# Altium PCB PS-25-001-E-02.PcbDoc
Units mil, origin at the board's own origin, x right, y up, seen from the top; angles counter-clockwise.
Board outline 2755.91 x 2362.2 mil, 5 copper layers (Top Layer, Internal Plane 3, Internal Plane 4, Internal Plane 2, Bottom Layer), stack 37.034 mil thick; 144 components, 56 nets, 347 pads, 244 vias.
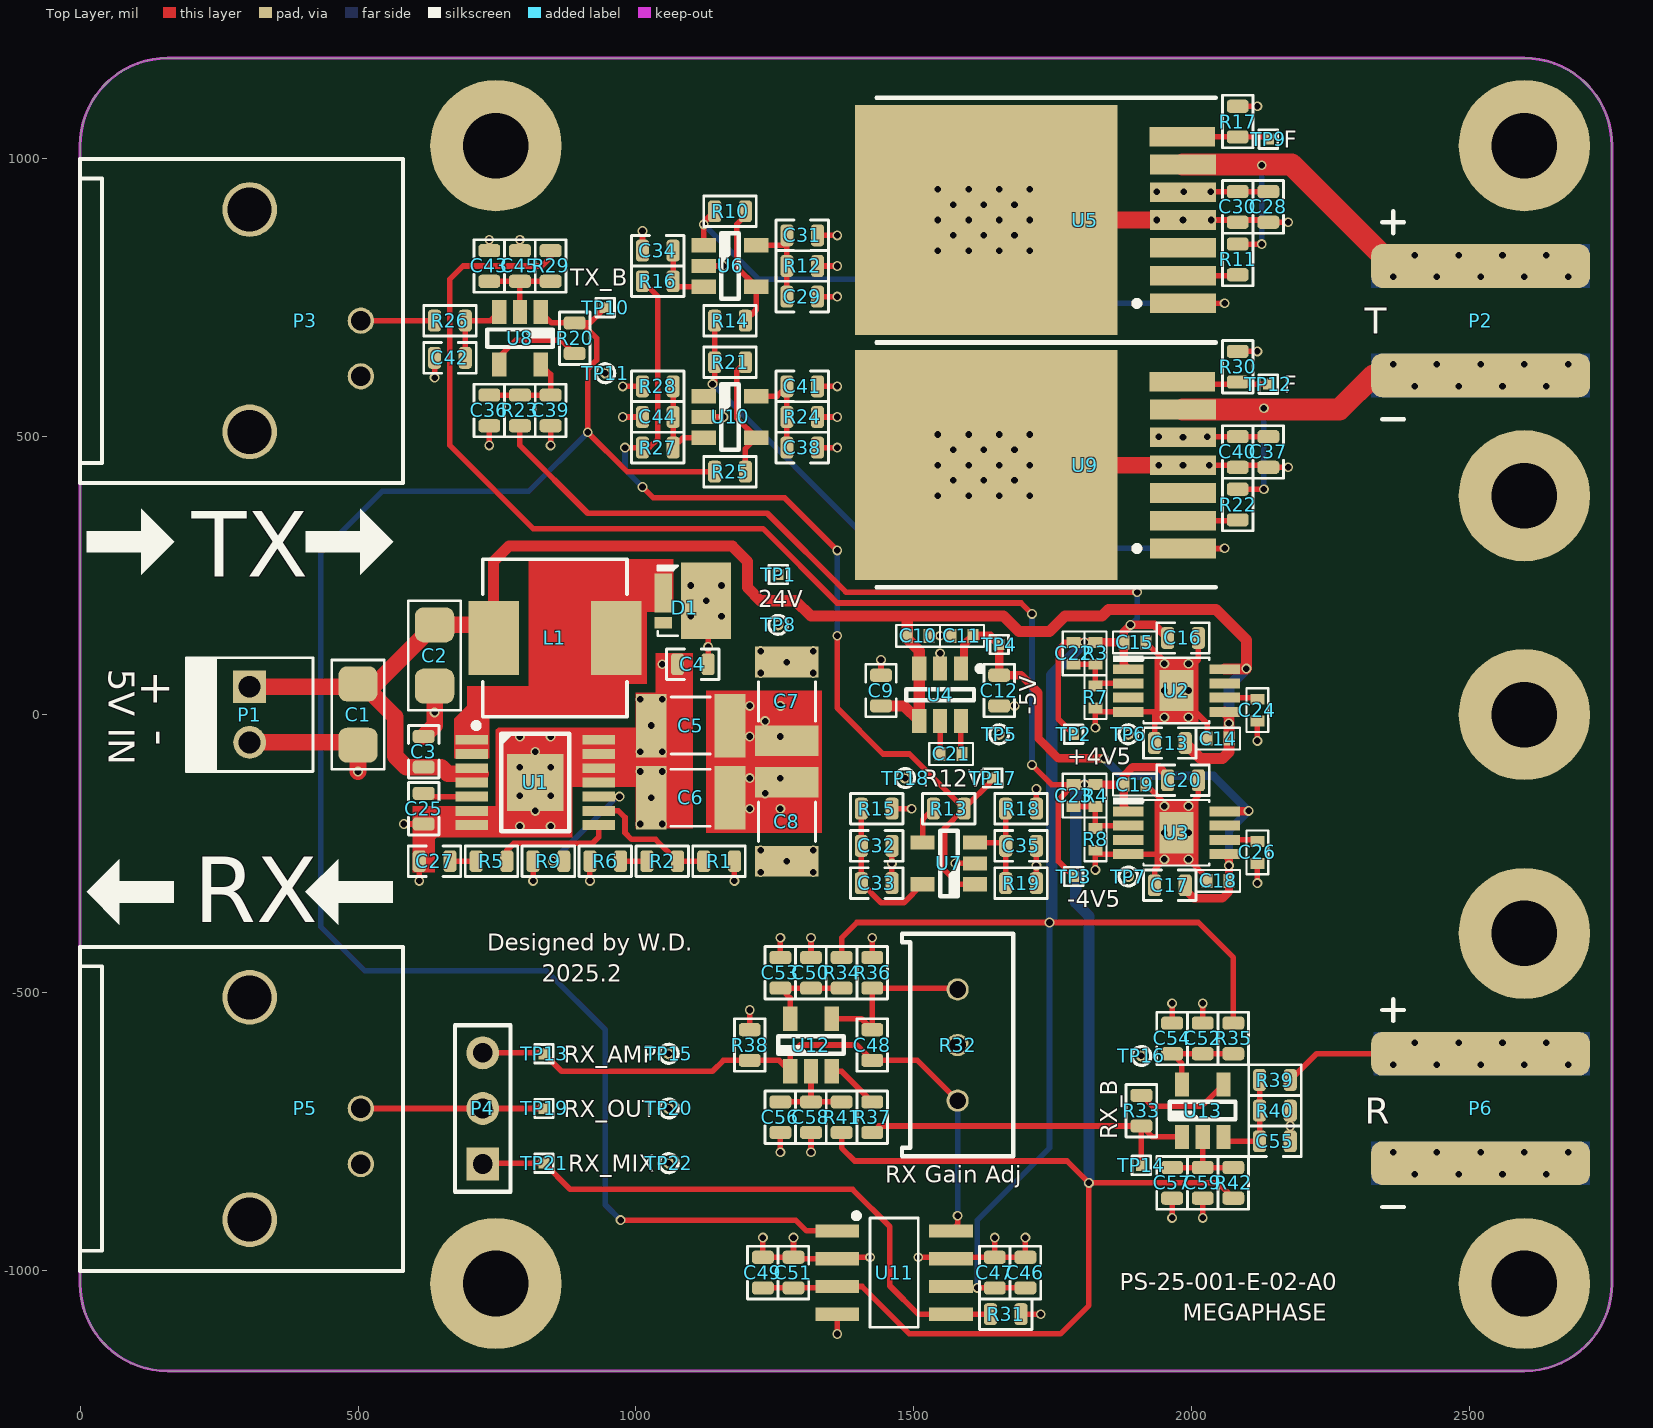
[diagram p0: Top Layer view]
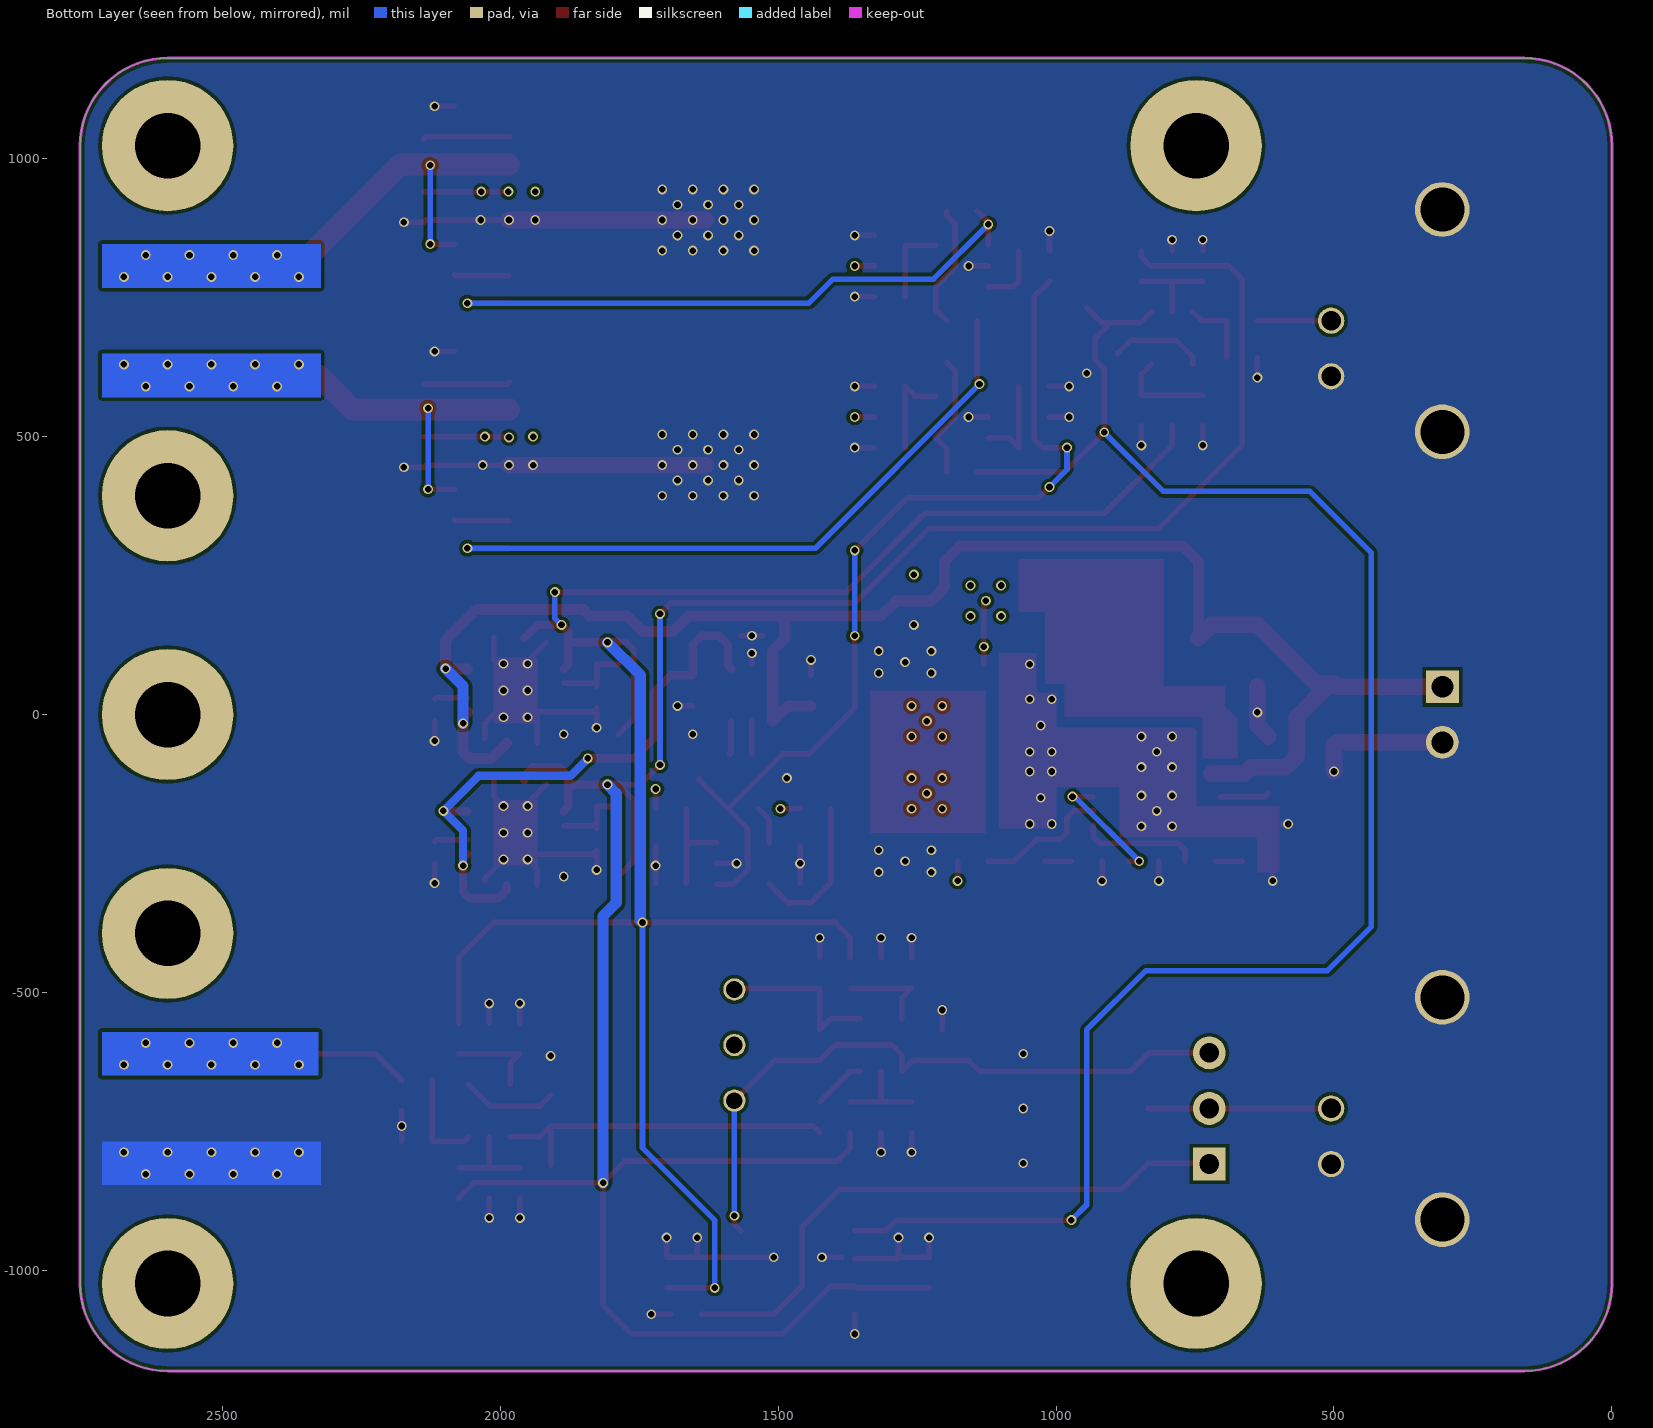
[diagram p1: Bottom Layer view, seen from below]
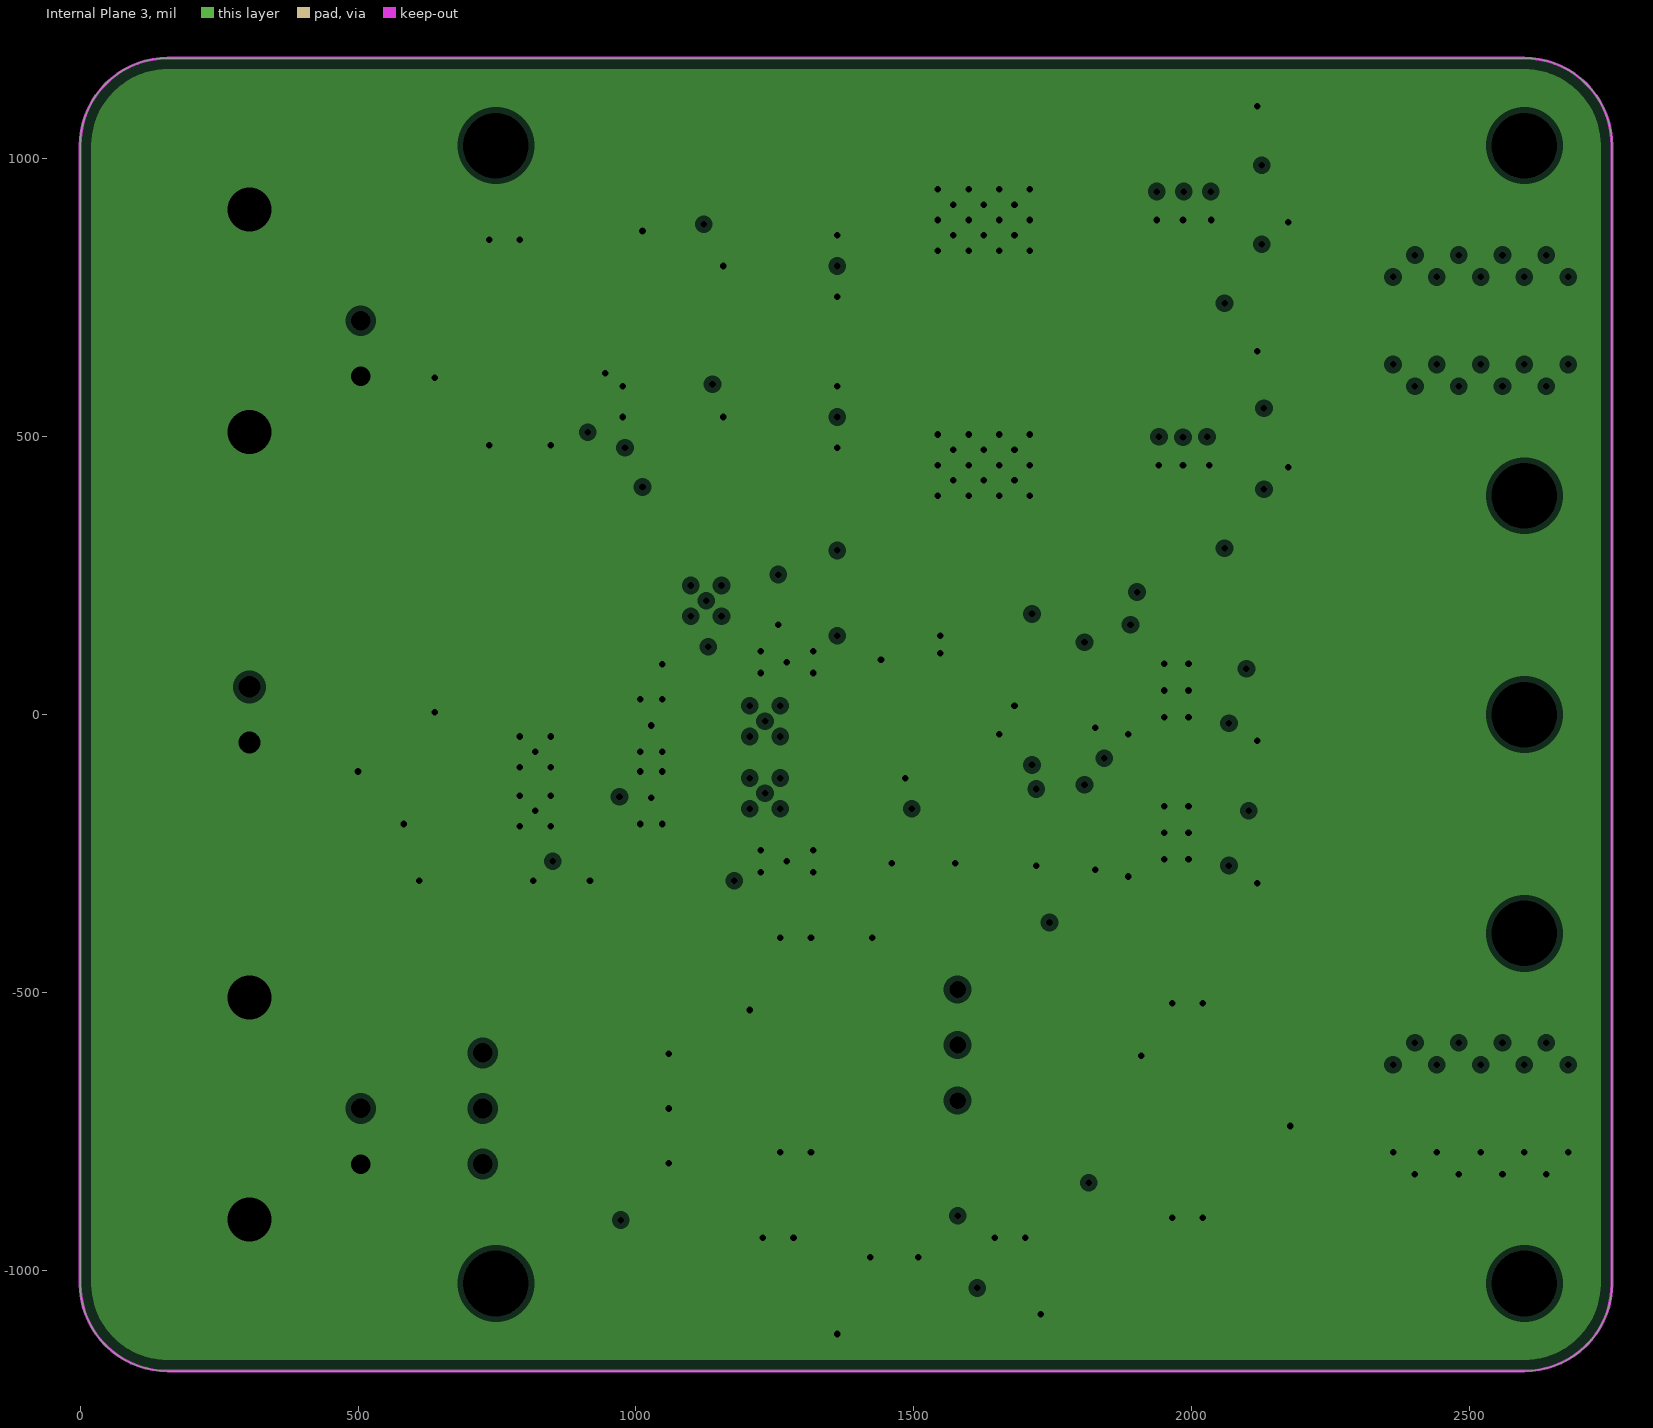
[diagram p2: Internal Plane 3, clearances drawn from the general rule]
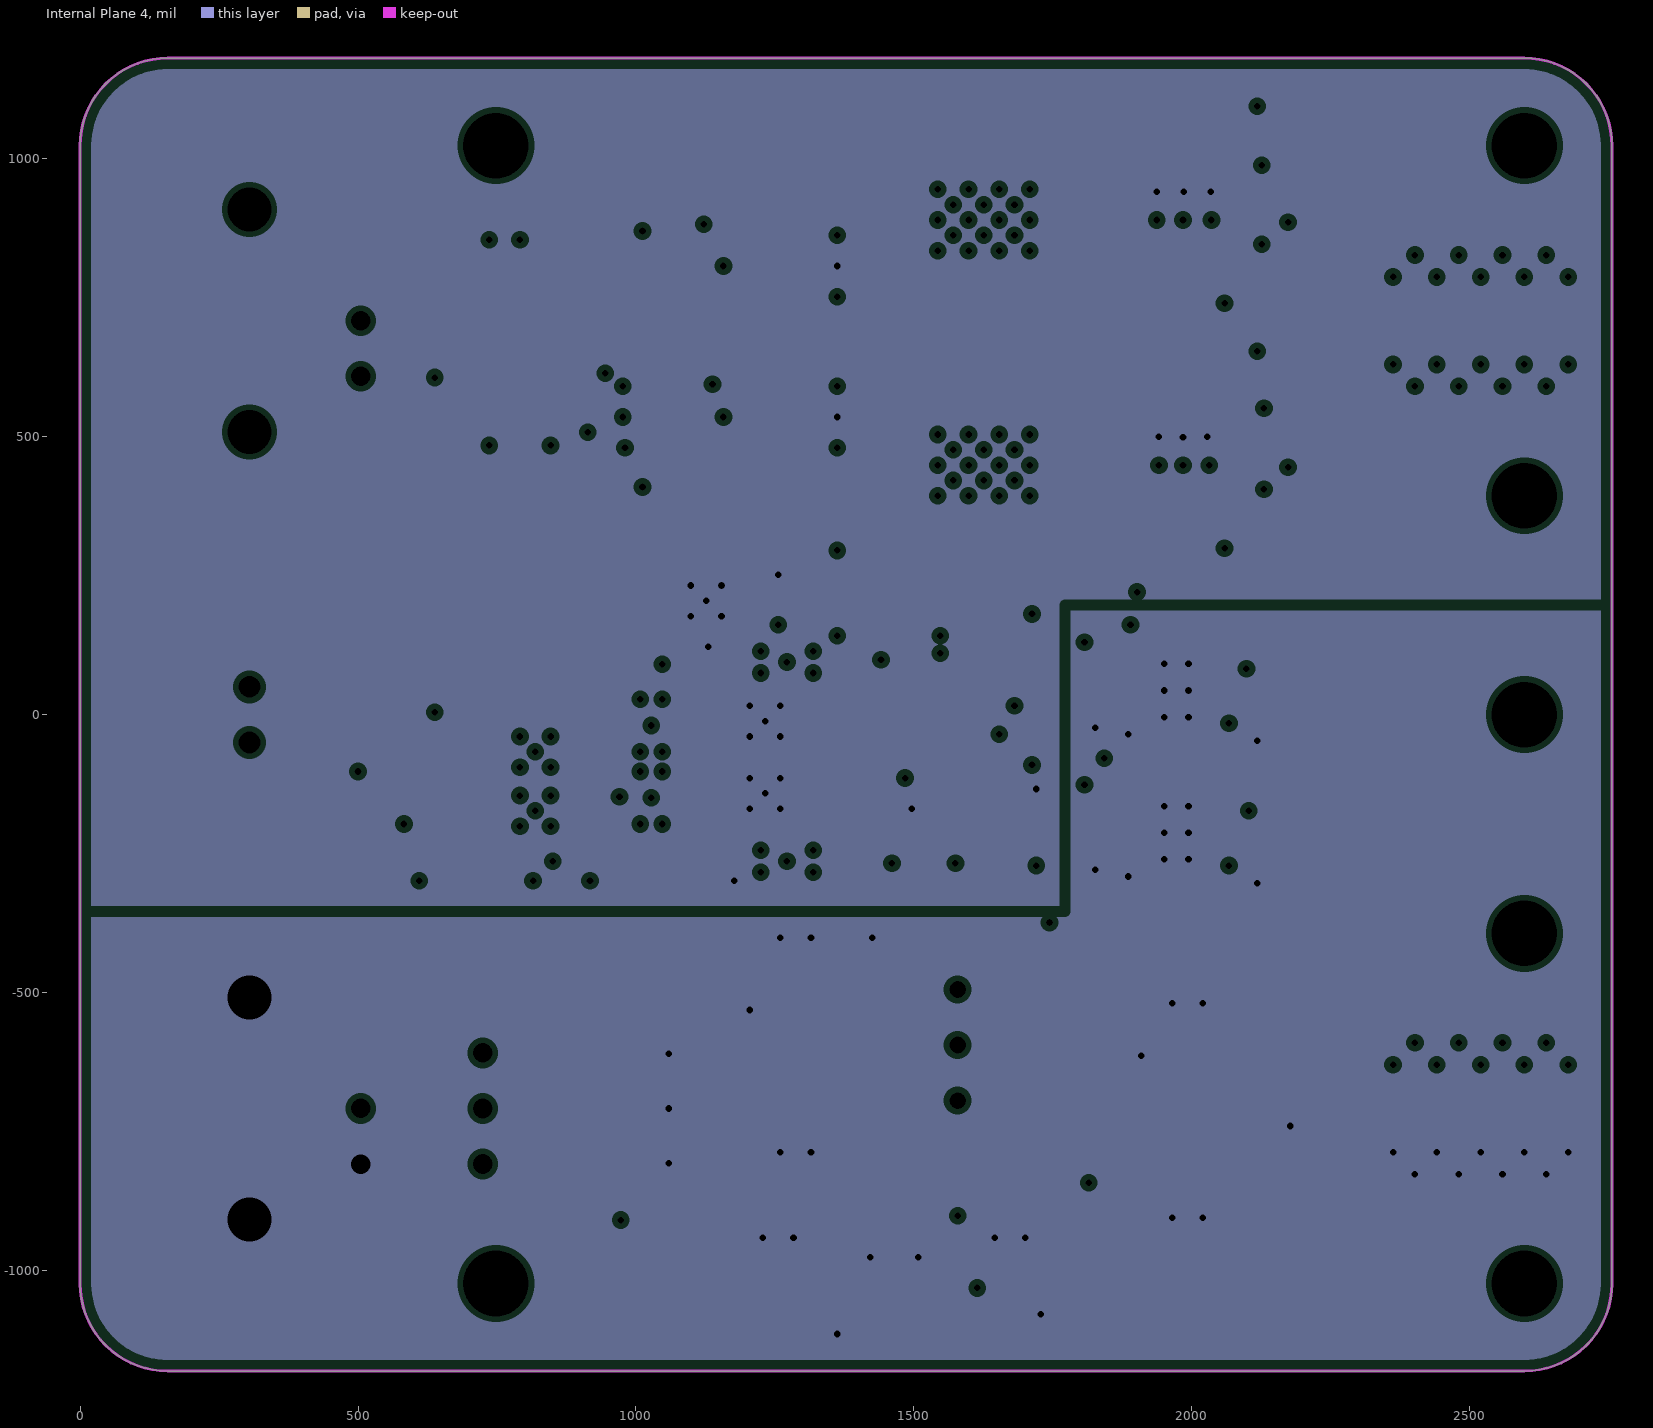
[diagram p3: Internal Plane 4, clearances drawn from the general rule]
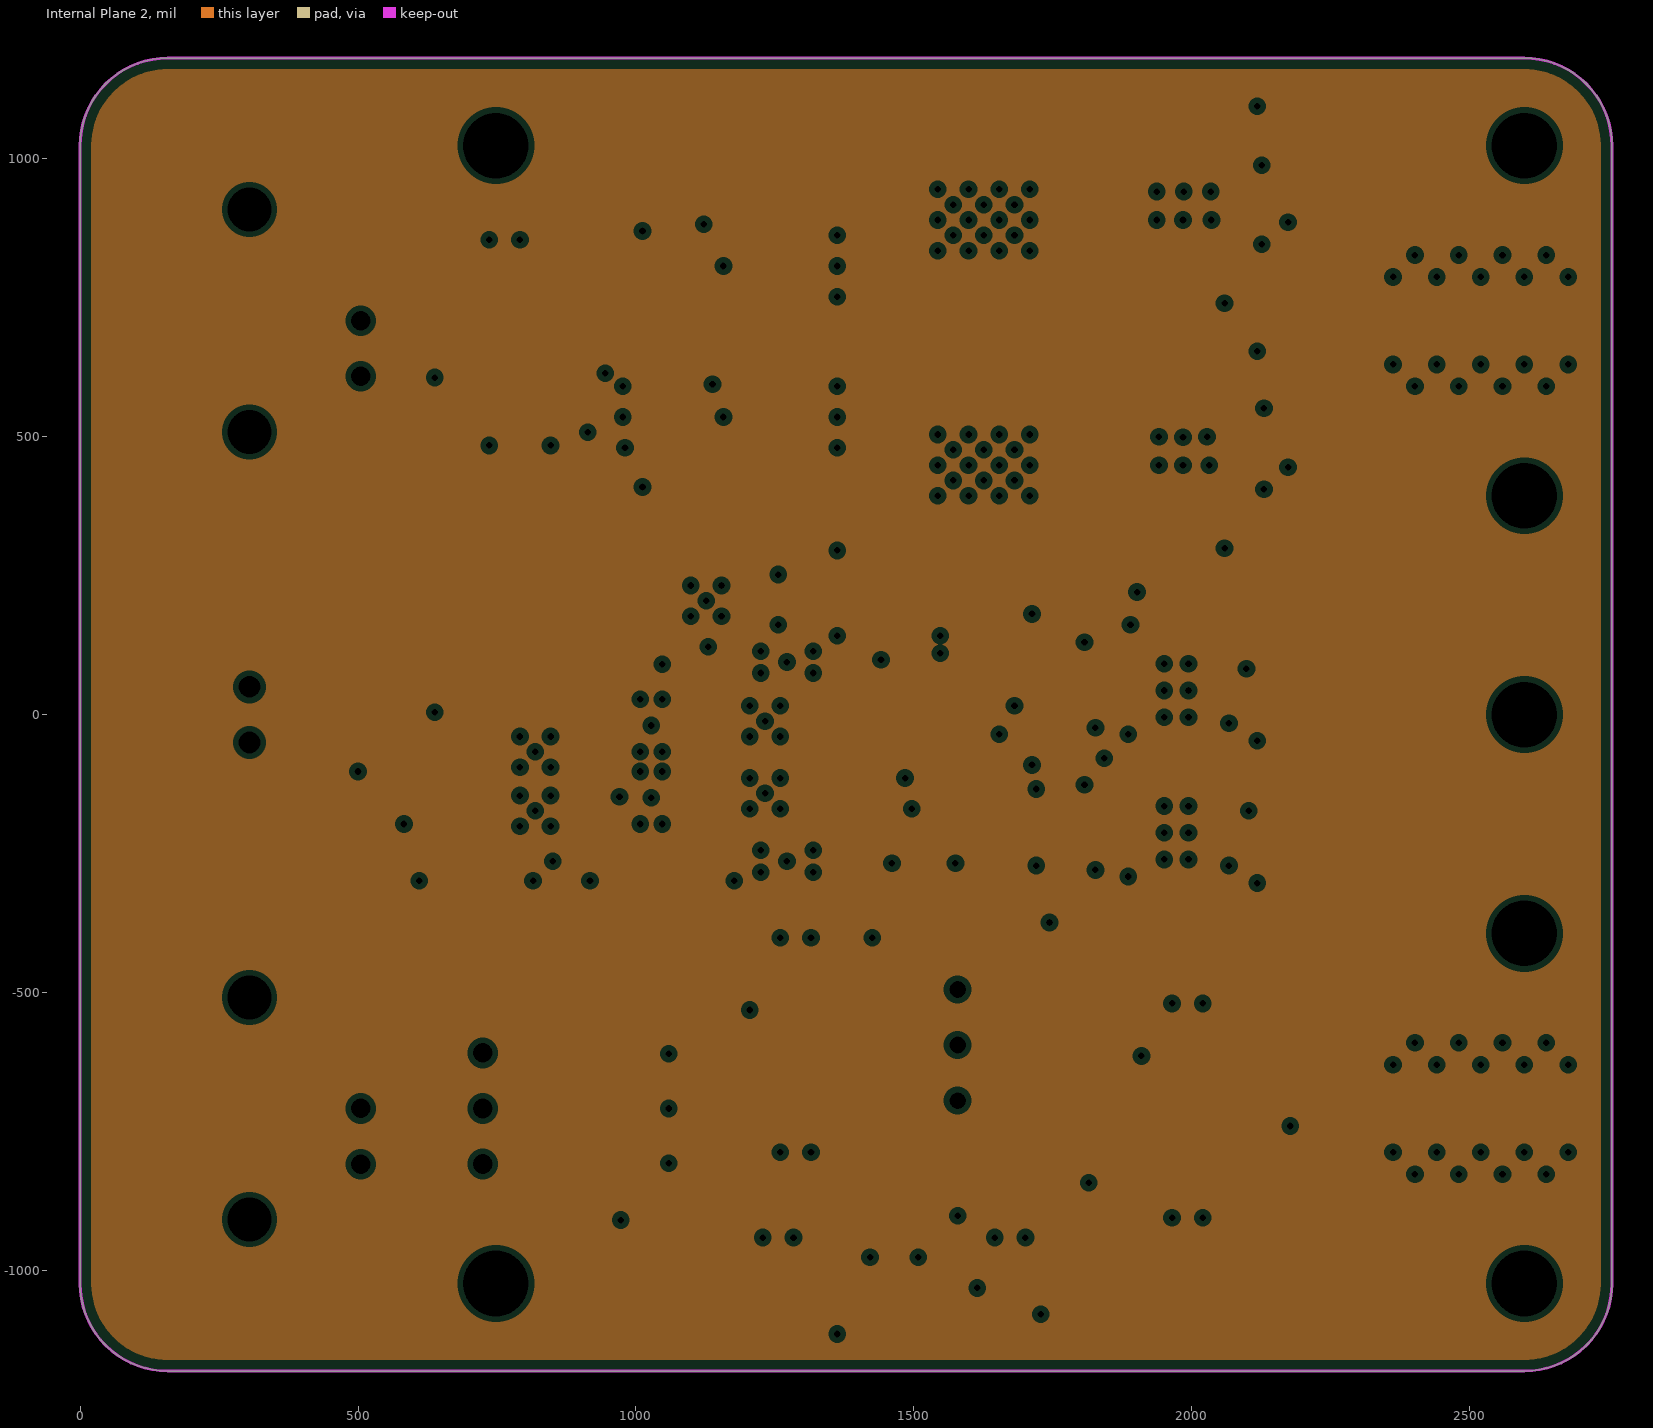
[diagram p4: Internal Plane 2, clearances drawn from the general rule]
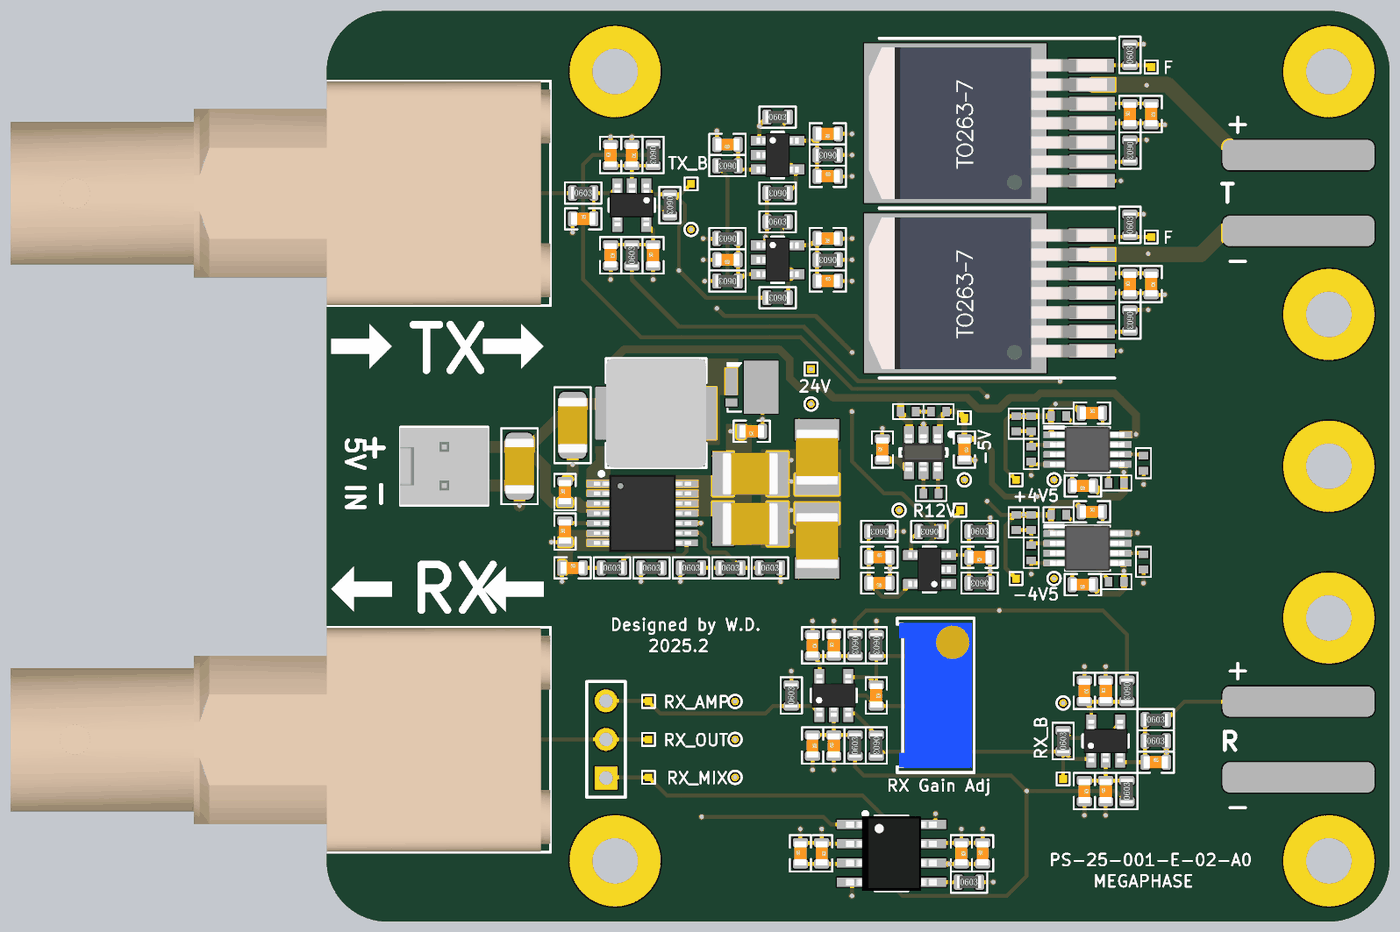
[diagram p5: 3D render of the assembled board from above, using the file's embedded part models]

## Layer stack, top to bottom
Top Solder: solder mask 0.4, Solder Resist, Dk 3.5
Top Layer: signal copper 1.4
Dielectric 1: core 10, FR-4, Dk 4.2
Internal Plane 3: plane copper 1.417, net GND
Dielectric 4: prepreg 5, Dk 4.2
Internal Plane 4: plane copper 1.417, net 24V
Dielectric 3: core 10, Dk 4.2
Internal Plane 2: plane copper 1.4
Dielectric2: prepreg 5, FR-4, Dk 4.2
Bottom Layer: signal copper 1.4
Bottom Solder: solder mask 0.4, Solder Resist, Dk 3.5

## Board outline
0,-1023.62 0,1023.62 cw(c157.48,1023.62) 157.48,1181.1 2598.43,1181.1 cw(c2598.43,1023.62) 2755.91,1023.62 2755.91,-1023.62 cw(c2598.43,-1023.62) 2598.43,-1181.1 157.48,-1181.1 cw(c157.48,-1023.62)

## Design rules (kind name [scope] priority, off if disabled: settings)
Clearance [All] p1: gap=6
ComponentClearance [All] p1 off: gap=10 collisioncheckmode=3 verticalgap=10 showdistances=FALSE
HoleSize [All] p1 off: absolutevalues=TRUE maxlimit=100 minlimit=1 maxpercent=80.000 minpercent=20.000
MinimumSolderMaskSliver [All] p1 off: minsoldermaskwidth=10
PlaneClearance [All] p1: clearance=10
PlaneConnect [All] p1: planeconnectstyle=Direct reliefexpansion=20 reliefentries=4 reliefconductorwidth=10 reliefairgap=10
PolygonConnect [All] p1: connectstyle=Direct reliefconductorwidth=10 reliefentries=4 polygonreliefangle="90 Angle" airgapwidth=10
RoutingVias [All] p1: holewidth=11.81 width=17.72 viastyle="Through Hole" minholewidth=11.81 minwidth=17.72 maxholewidth=39.37 maxwidth=78.74
SilkToSilkClearance [All] p1 off: silktosilkclearance=10
SilkToSolderMaskClearance [IsPad] p1 off: minsilkscreentomaskgap=10 clearancetoexposedcopper=TRUE
SolderMaskExpansion [All] p1: expansion=4
Width [All] p1: maxlimit=200 minlimit=6 preferedwidth=10
23 further rules are at their usual default settings.

## Components (designator, comment, footprint, x,y, rotation, side; value= is the part's Value field where it differs from the comment)
C1 "220uF/6.3V  1206" 1206CAP 500,0 r90 top
C2 "220uF/6.3V  1206" 1206CAP 637.8,106.3 r90 top
C3 "0.1uF" 1608[0603]CAP 618.11,-66.93 r90 top
C4 "0.1uF" 1608[0603]CAP 1102.36,90.55 r180 top
C5 "22uF/35V 1210" 1210CAP 1098.43,-19.69 r0 top
C6 "22uF/35V 1210" 1210CAP 1098.43,-149.61 r0 top
C7 "22uF/35V 1210" 1210CAP 1271.65,23.62 r270 top
C8 "22uF/35V 1210" 1210CAP 1271.65,-192.91 r90 top
C9 "22uF/10V 0603" 1608[0603]CAP 1440.94,43.31 r90 top
C10 "0.1uF" 1005[0402]CAP 1507.87,141.73 r180 top
C11 "0.1uF" 1005[0402]CAP 1586.61,141.73 r0 top
C12 "22uF/10V 0603" 1608[0603]CAP 1653.54,43.31 r270 top
C13 "22uF/10V 0603" 1608[0603]CAP 1960.63,-51.18 r180 top
C14 "0.1uF" 1005[0402]CAP 2047.24,-43.31 r0 top
C15 "0.1uF" 1005[0402]CAP 1897.64,129.92 r180 top
C16 "22uF/10V 0603" 1608[0603]CAP 1984.25,137.8 r0 top
C17 "22uF/10V 0603" 1608[0603]CAP 1960.63,-307.09 r180 top
C18 "0.1uF" 1005[0402]CAP 2047.24,-299.21 r0 top
C19 "0.1uF" 1005[0402]CAP 1897.64,-125.98 r180 top
C20 "22uF/10V 0603" 1608[0603]CAP 1984.25,-118.11 r0 top
C21 "1uF" 1005[0402]CAP 1566.93,-70.87 r180 top
C22 "10nF" 1005[0402]CAP 1787.4,110.24 r90 top
C23 "10nF" 1005[0402]CAP 1787.4,-145.67 r90 top
C24 "10nF" 1005[0402]CAP 2118.11,7.87 r90 top
C25 "0.1uF" 1608[0603]CAP 618.11,-169.29 r90 top
C26 "10nF" 1005[0402]CAP 2118.11,-248.03 r90 top
C27 "33nF" 1608[0603]CAP 637.8,-263.78 r0 top
C28 "10uF/25V" 1608[0603]CAP 2137.8,913.39 r270 top
C29 "10uF/25V" 1608[0603]CAP 1299.21,751.97 r0 top
C30 "0.1uF" 1608[0603]CAP 2082.68,913.39 r90 top
C31 "0.1uF" 1608[0603]CAP 1299.21,862.2 r180 top
C32 "10uF/25V" 1608[0603]CAP 1433.07,-236.22 r0 top
C33 "0.1uF" 1608[0603]CAP 1433.07,-303.15 r180 top
C34 "0.1uF" 1608[0603]CAP 1039.37,834.65 r180 top
C35 "10uF/25V" 1608[0603]CAP 1692.91,-236.22 r180 top
C36 "10uF/25V" 1608[0603]CAP 736.22,547.24 r270 top
C37 "10uF/25V" 1608[0603]CAP 2137.8,472.44 r270 top
C38 "10uF/25V" 1608[0603]CAP 1299.21,480.32 r0 top
C39 "0.1uF" 1608[0603]CAP 846.46,547.24 r90 top
C40 "0.1uF" 1608[0603]CAP 2082.68,472.44 r90 top
C41 "0.1uF" 1608[0603]CAP 1299.21,590.55 r180 top
C42 "DNI" 1608[0603]CAP 665.35,641.73 r0 top
C43 "10uF/25V" 1608[0603]CAP 736.22,807.09 r90 top
C44 "0.1uF" 1608[0603]CAP 1039.37,535.43 r180 top
C45 "0.1uF" 1608[0603]CAP 791.34,807.09 r270 top
C46 "10uF/25V" 1608[0603]CAP 1700.79,-1003.94 r90 top
C47 "0.1uF" 1608[0603]CAP 1645.67,-1003.94 r270 top
C48 "DNI" 1608[0603]CAP 1425.2,-594.49 r270 top
C49 "10uF/25V" 1608[0603]CAP 1228.35,-1003.94 r90 top
C50 "10uF/25V" 1608[0603]CAP 1314.96,-464.57 r90 top
C51 "0.1uF" 1608[0603]CAP 1283.46,-1003.94 r270 top
C52 "10uF/25V" 1608[0603]CAP 2019.69,-582.68 r90 top
C53 "0.1uF" 1608[0603]CAP 1259.84,-464.57 r270 top
C54 "0.1uF" 1608[0603]CAP 1964.57,-582.68 r270 top
C55 "DNI" 1608[0603]CAP 2149.61,-767.72 r0 top
C56 "10uF/25V" 1608[0603]CAP 1259.84,-724.41 r270 top
C57 "10uF/25V" 1608[0603]CAP 1964.57,-842.52 r270 top
C58 "0.1uF" 1608[0603]CAP 1314.96,-724.41 r90 top
C59 "0.1uF" 1608[0603]CAP 2019.69,-842.52 r90 top
D1 "STPS6M100DEE" STPS6M100DEE 1102.36,204.72 r270 top
L1 "CYA0630-10UH" L6.6X7.2 854.33,137.8 r0 top
P1 "Header 2" KEF2510_2P 305,0 r270 top
P2 "Header 2" USTR_16MM_H 2519.69,708.66 r0 top
P3 "5227661-1" BNC_5227661-1 0,708.66 r90 top
P4 "Header 3" HDR1X3 724.41,-808.66 r90 top
P5 "5227661-1" BNC_5227661-1 0,-708.66 r90 top
P6 "Header 2" USTR_16MM_H 2519.69,-708.66 r0 top
R1 "187K" 1608[0603]RES 1149.61,-263.78 r0 top
R2 "10K" 1608[0603]RES 1047.24,-263.78 r0 top
R3 "2.8K" 1005[0402]RES 1826.77,110.24 r90 top
R4 "2.87K" 1005[0402]RES 1826.77,-145.67 r90 top
R5 "3.6K" 1608[0603]RES 740.16,-263.78 r0 top
R6 "93.1R" 1608[0603]RES 944.88,-263.78 r0 top
R7 "1K" 1005[0402]RES 1826.77,31.5 r90 top
R8 "1K" 1005[0402]RES 1826.77,-224.41 r90 top
R9 "51K" 1608[0603]RES 842.52,-263.78 r0 top
R10 "10K" 1608[0603]RES 1169.29,905.51 r0 top
R11 "10R" 1608[0603]RES 2082.68,818.9 r270 top
R12 "10R" 1608[0603]RES 1299.21,807.09 r180 top
R13 "10R" 1608[0603]RES 1562.99,-169.29 r180 top
R14 "10K" 1608[0603]RES 1169.29,708.66 r180 top
R15 "10R" 1608[0603]RES 1433.07,-169.29 r180 top
R16 "10K" 1608[0603]RES 1039.37,779.53 r180 top
R17 "100K" 1608[0603]RES 2082.68,1066.93 r90 top
R18 "10K" 1608[0603]RES 1692.91,-169.29 r0 top
R19 "10K" 1608[0603]RES 1692.91,-303.15 r180 top
R20 "10R" 1608[0603]RES 889.76,677.17 r270 top
R21 "100K" 1608[0603]RES 1169.29,633.86 r0 top
R22 "10R" 1608[0603]RES 2082.68,377.95 r270 top
R23 "10R" 1608[0603]RES 791.34,547.24 r90 top
R24 "10R" 1608[0603]RES 1299.21,535.43 r180 top
R25 "10K" 1608[0603]RES 1169.29,437.01 r180 top
R26 "1K" 1608[0603]RES 665.35,708.66 r0 top
R27 "10K" 1608[0603]RES 1039.37,480.32 r180 top
R28 "1K" 1608[0603]RES 1039.37,590.55 r180 top
R29 "10R" 1608[0603]RES 846.46,807.09 r270 top
R30 "100K" 1608[0603]RES 2082.68,625.98 r90 top
R31 "10K" 1608[0603]RES 1665.35,-1078.74 r0 top
R32 "100K 3296" 3296 1578.74,-594.49 r180 top
R33 "10R" 1608[0603]RES 1909.45,-712.6 r90 top
R34 "10R" 1608[0603]RES 1370.08,-464.57 r270 top
R35 "10R" 1608[0603]RES 2074.8,-582.68 r270 top
R36 "1K" 1608[0603]RES 1425.2,-464.57 r270 top
R37 "1K" 1608[0603]RES 1425.2,-724.41 r270 top
R38 "10K" 1608[0603]RES 1204.72,-594.49 r90 top
R39 "10R" 1608[0603]RES 2149.61,-657.48 r0 top
R40 "100K" 1608[0603]RES 2149.61,-712.6 r0 top
R41 "10R" 1608[0603]RES 1370.08,-724.41 r90 top
R42 "10R" 1608[0603]RES 2074.8,-842.52 r90 top
TP1 "TP_P" tpad_020_REC 1255.91,251.97 r90 top
TP2 "TP_P" tpad_020_REC 1787.4,-35.43 r90 top
TP3 "TP_P" tpad_020_REC 1787.4,-291.34 r90 top
TP4 "TP_P" tpad_020_REC 1653.54,125.98 r90 top
TP5 "TP_N" tpad_020 1653.54,-35.43 r90 top
TP6 "TP_N" tpad_020 1885.83,-35.43 r90 top
TP7 "TP_N" tpad_020 1885.83,-291.34 r90 top
TP8 "TP_N" tpad_020 1255.91,161.42 r90 top
TP9 "TP_P" tpad_020_REC 2137.8,1035.43 r90 top
TP10 "TP_P" tpad_020_REC 944.88,732.28 r90 top
TP11 "TP_N" tpad_020 944.88,614.17 r90 top
TP12 "TP_P" tpad_020_REC 2137.8,594.49 r90 top
TP13 "TP_P" tpad_020_REC 834.65,-610.24 r90 top
TP14 "TP_P" tpad_020_REC 1909.45,-811.02 r90 top
TP15 "TP_N" tpad_020 1059.06,-610.24 r90 top
TP16 "TP_N" tpad_020 1909.45,-614.17 r90 top
TP17 "TP_P" tpad_020_REC 1641.73,-114.17 r90 top
TP18 "TP_N" tpad_020 1484.25,-114.17 r90 top
TP19 "TP_P" tpad_020_REC 834.65,-708.66 r90 top
TP20 "TP_N" tpad_020 1059.06,-708.66 r90 top
TP21 "TP_P" tpad_020_REC 834.65,-807.09 r270 top
TP22 "TP_N" tpad_020 1059.06,-807.09 r270 top
U1 "TPS61175PWP" TSSOP14_PAD 818.9,-122.05 r0 top
U2 "TPS7A4901DGN" HVSSOP8 1972.44,43.31 r0 top
U3 "TPS7A3001DGN" HVSSOP8 1972.44,-212.6 r0 top
U4 "LM2776DBV" SOT23-6 1547.24,35.43 r270 top
U5 "OPA552FA" TO-263-7 1807.09,889.76 r90 top
U6 "OPA810IDBVR" SOT23-5 1169.29,807.09 r0 top
U7 "OPA810IDBVR" SOT23-5 1562.99,-267.72 r180 top
U8 "OPA810IDBVR" SOT23-5 791.34,677.17 r270 top
U9 "OPA552FA" TO-263-7 1807.09,448.82 r90 top
U10 "OPA810IDBVR" SOT23-5 1169.29,535.43 r0 top
U11 "AD835ARZ" SO8 1464.57,-1003.94 r270 top
U12 "OPA810IDBVR" SOT23-5 1314.96,-594.49 r90 top
U13 "OPA810IDBVR" SOT23-5 2019.69,-712.6 r90 top

## Footprints (in the part's own frame and the unit in brackets; to place one, negate y for a bottom-side part, rotate by r counter-clockwise, add the part's x,y. Pads: shape width x height; smd on the part's side, far side on the other; paste and mask are expansions set on the pad)
1005[0402]CAP [mm]
  rect 0.5x0.635 smd: 1(-0.5,0) 2(0.5,0)
  silkscreen extent -1,-0.5 1,0.5, body extent -0.5,-0.25 0.5,0.25, height 0.3
1005[0402]RES [mm]
  rect 0.5x0.635 smd: 1(-0.5,0) 2(0.5,0)
  silkscreen extent -1,-0.5 1,0.5, body extent -0.5,-0.25 0.5,0.25, height 0.3
1206CAP [mm]
  rrect50% 1.6x1.8 smd: 1(-1.4,0) 2(1.4,0)
  silkscreen extent -2.5,-1.2 2.5,1.2, body extent -1.85,-0.98 1.85,0.97, height 1.21
1210CAP [mm]
  rect 1.4x2.9 smd: 1(-1.8,0) 2(1.8,0)
  silkscreen extent -0.9,-1.3 0.9,1.3, body extent -1.85,-1.4 1.85,1.4, height 2.88
1608[0603]CAP [mm]
  rrect50% 0.6x1 smd: 1(-0.7,0) 2(0.7,0)
  silkscreen extent -1.2,-0.7 1.2,0.7, body extent -0.8,-0.4 0.8,0.4, height 0.3
1608[0603]RES [mm]
  rrect50% 0.6x1 smd: 1(-0.7,0) 2(0.7,0)
  silkscreen extent -1.2,-0.7 1.2,0.7, body extent -0.8,-0.4 0.8,0.4, height 0.45
3296 [mil]
  round 40 hole 30: 1(0,-100) 2(0,100) 3(0,0)
  silkscreen extent -100,-200 100,200, body extent -94,-188 94,188, height 455
BNC_5227661-1 [mm]
  round 1.2 hole 0.89 mask+0.05: 1(0,-12.83) 2(-2.54,-12.83)
  round 2.5 hole 2.01 mask+0.05: 3(5.08,-7.75) 4(-5.08,-7.75)
  silkscreen extent -7.42,-14.75 7.38,0, body extent -7.4,-14.75 7.36,20.81, height 15.88
HDR1X3 [mm] "Connector; Header; 3 Position"
  rect 1.5x1.5 hole 0.9: 1(0,0)
  round 1.5 hole 0.9: 2(2.54,0) 3(5.08,0)
  silkscreen extent -1.27,-1.27 6.35,1.27
HVSSOP8 [mm]
  rect 1.4x0.45 smd mask+0.04: 1(-2.2,0.975) 2(-2.2,0.325) 3(-2.2,-0.325) 4(-2.2,-0.975) 5(2.2,-0.975) 6(2.2,-0.325) 7(2.2,0.325) 8(2.2,0.975)
  rect 1.57x1.89 smd: 9(0,0)
  Top Layer region: -1,-1.5 1,-1.5 1,1.5 -1,1.5
  silkscreen extent -2.9,-1.5 1.5,1.6, body extent -2.45,-1.5 2.45,1.5, height 1.05
KEF2510_2P [mm]
  rect 1.5x1.5 hole 1: 1(-1.27,0)
  round 1.5 hole 1: 2(1.27,0)
  silkscreen extent -2.6,-2.9 2.6,2.9, body extent -2.54,-2.9 2.54,2.9, height 11.45
L6.6X7.2 [mm]
  rect 2.3x3.4 smd paste+0.05: 1(-2.8,0) 2(2.8,0)
  silkscreen extent -3.3,-3.6 3.3,3.6, body extent -3.3,-3.6 3.3,3.6, height 3
SO8 [mm]
  rect 0.6x2 smd: 1(-1.905,-2.6) 2(-0.635,-2.6) 3(0.635,-2.6) 4(1.905,-2.6) 5(1.905,2.6) 6(0.635,2.6) 7(-0.635,2.6) 8(-1.905,2.6)
  silkscreen extent -2.72,-1.85 2.5,1.1, body extent -2.44,-2.99 2.46,3, height 1.5
SOT23-5 [mm] "SOT23, 5-Leads, Body 2.9x1.6mm, Pitch 0.95mm, Lead Span 2.8mm, IPC Medium Density"
  rect 1.1x0.65 smd: 1(-1.2,0.95) 2(-1.2,0) 3(-1.2,-0.95) 4(1.2,-0.95) 5(1.2,0.95)
  silkscreen extent -0.4,-1.5 0.4,1.5, body extent -1.4,-1.45 1.4,1.45, height 1.45
SOT23-6 [mm] "SOT23, 5-Leads, Body 2.9x1.6mm, Pitch 0.95mm, Lead Span 2.8mm, IPC Medium Density"
  rect 1.1x0.65 smd: 1(-1.2,0.95) 2(-1.2,0) 3(-1.2,-0.95) 4(1.2,-0.95) 5(1.2,0) 6(1.2,0.95)
  silkscreen extent -1.32,-1.55 0.25,1.95, body extent -1.2,-1.4 1.23,1.4, height 1.09
STPS6M100DEE [mm]
  rect 1.79x0.8 smd mask+0.07: 1(-0.355,-1.35)
  rect 3.5x2.28 smd mask+0.07: 2(0,0.61)
  rect 0.52x0.8 smd mask+0.07: 3(1.01,-1.35)
  silkscreen extent -1.6,-1.6 1.6,-0.7, body extent -1.6,-1.6 1.6,1.6, height 1
TO-263-7 [mm] "D2-PAK; 7 Leads; Body 14.4 (inc. leads) x 10.4 mm (LxW max)"
  rect 0.9x3 smd: 1(-3.81,-4.5) 2(-2.54,-4.5) 3(-1.27,-4.5) 4(0,-4.5) 5(1.27,-4.5) 6(2.54,-4.5) 7(3.81,-4.466)
  rect 10.5x12 smd: 8(0,4.5)
  silkscreen extent -5.59,-5.99 5.59,9.5, body extent -5,-5.49 5,10.18, height 4.78
tpad_020 [mil]
  round 20 smd paste-20: 1(0,0)
  silkscreen extent -17,-17 17,17
tpad_020_REC [mil]
  rect 20x20 smd paste-20: 1(0,0)
  silkscreen extent -17,-17 17,17
TSSOP14_PAD [mm]
  rect 1.5x0.45 smd mask+0.05: 1(-2.9,1.95) 2(-2.9,1.3) 3(-2.9,0.65) 4(-2.9,0) 5(-2.9,-0.65) 6(-2.9,-1.3) 7(-2.9,-1.95) 8(2.9,-1.95) 9(2.9,-1.3) 10(2.9,-0.65) 11(2.9,0) 12(2.9,0.65) 13(2.9,1.3) 14(2.9,1.95)
  rect 2.6x2.6 smd paste+0.05 mask+0.05: 15(0,0)
  Top Layer region: -1.7,-2.5 1.7,-2.5 1.7,2.5 -1.7,2.5
  silkscreen extent -2.82,-2.22 1.55,2.72, body extent -3.2,-2.55 3.2,2.55, height 1.2
USTR_16MM_H [mm]
  rrect50% 10x2 smd: 1(0,2.5) 2(0,-2.5)
  silkscreen extent -4.5,-4.5 -3.5,5

## Part data
C1 C2 C3 C4 C5 C6 C7 C8 C9 C10 C11 C12 C13 C14 C15 C16 C17 C18 C19 C20 C21 C22 C23 C24 C25 C26 C27 C28 C29 C30 C31 C32 C33 C34 C35 C36 C37 C38 C39 C40 C41 C42 C43 C44 C45 C46 C47 C48 C49 C50 C51 C52 C53 C54 C55 C56 C57 C58 C59: library part Cap, "Capacitor"
D1: library part "D Schottky_S", "Zener Diode"
L1: library part Inductor_S, "Inductor"
P1 P2 P6: "Header, 2-Pin"
P3 P5: library part BNC_TE, "BNC Elbow Connector"
P4: "Header, 3-Pin"
R1 R2 R3 R4 R5 R6 R7 R8 R9 R10 R11 R12 R13 R14 R15 R16 R17 R18 R19 R20 R21 R22 R23 R24 R25 R26 R27 R28 R29 R30 R31 R33 R34 R35 R36 R37 R38 R39 R40 R41 R42: library part Res1, "Resistor"
R32: library part "Res Adj1", "Variable Resistor"
U1: library part TPS61175
U4: library part LM2776
U6 U7 U8 U10 U12 U13: library part LM7321MF, "Op Amp"

## Free pads (board coordinates)
  round 236.22 hole 118.11: 0(748.03,-1023.62) 0(748.03,1023.62) 0(2598.43,-1023.62) 0(2598.43,-393.7) 0(2598.43,0) 0(2598.43,393.7) 0(2598.43,1023.62)

## Via types
v1: diameter 17.72, hole 11.81, Top Layer to Bottom Layer, tented both sides, 244 vias

## Nets (pads, with @x,y where several pads share a name; then routed paths per layer and width w, separated by ;. In a path a pad name is that pad's centre, name@x,y a point inside that pad or via, vN(x,y) a via of type N, cw(c..) or ccw(c..) an arc to the next point about the centre after c; other vN are vias at no path point)
5V: C1.2 C2.2 C3.1 C9.1 C10.2 C13.1 C14.2 L1.1 P1.1 U1.3 U1.4 U2.5 U2.8 U4.3 U4.4 | length 3100.8
  Top Layer w20: L1.1 744.09,275.59 771.65,303.15 1173.23,303.15 1200.79,275.59 1200.79,228.35 1224.41,204.72 1287.4,204.72 1314.96,177.17 1488.19,177.17 ; C9.1 1482.28,15.75 U4.4 U4.3 1509.84,114.48 1488.19,136.13 C10.2 1488.19,177.17 ; C13.1 2015.75,-78.74 2055.12,-78.74 2066.93,-66.93 C14.2 v1(2066.93,-15.75) 2066.93,-2.95 U2.5 ; U2.8 2097.44,81.69 v1(2098.43,82.68) 2098.43,133.86 2043.31,188.98 1850.39,188.98 1838.58,177.17 1771.65,177.17 1744.09,149.61 1688.98,149.61 1661.42,177.17 1488.19,177.17
  Top Layer w30: P1.1 494.88,50 C1.2 C1.2@507.87,55.12 ; 720.47,-106.3 661.42,-106.3 649.61,-94.49 C3.1 586.61,-94.49 566.93,-74.8 566.93,-3.94 C1.2@507.87,55.12 ; L1.1 720.47,161.42 C2.2 531.5,55.12 C1.2@507.87,55.12
  Bottom Layer w20: v1(2066.93,-15.75) 2066.93,51.18 v1(2098.43,82.68)
24V: C4.1 C5.2 C6.2 C7.2 C8.2 C28.1 C30.2 C37.1 C40.2 D1.2 R1.2 R12.1 R15.1 R18.2 R24.1 TP1.1 U5.5 U9.5 | length 600.9
  Top Layer w10: v1(1126.38,204.72) 1129.92,201.18 C4.1 ; v1(1177.17,-299.21) R1.2 ; R24.1 v1(1362.2,535.43) ; R12.1 v1(1362.2,807.09) ; R15.1 v1(1496.06,-169.29) ; R18.2 v1(1720.47,-133.86) ; v1(1984.25,498.82) 1985.43,500 v1(2027.56,500) C40.2 C37.1 ; U5.5 v1(1985.43,940.94) v1(2034.06,940.94) C30.2 C28.1
  other v1: 1204.72,-169.29 1259.84,-169.29 1232.28,-141.73 1204.72,-114.17 1259.84,-114.17 1204.72,-39.37 1259.84,-39.37 1232.28,-11.81 1204.72,15.75 1259.84,15.75 1129.92,122.05 1098.82,177.17 1153.94,177.17 1098.82,232.28 1153.94,232.28 1255.91,251.97 1940.94,500 1937.01,940.94
+4V5: C15.2 C16.1 C22.2 C46.1 C47.2 R3.2 R23.1 R34.1 R35.1 TP2.1 U2.1 U11.6 | length 3995.1
  Top Layer w10: R23.1 791.34,484.25 913.39,362.2 1236.22,362.2 1377.95,220.47 v1(1901.57,220.47) ; R34.1 1370.08,-401.57 1397.64,-374.02 v1(1744.09,-374.02) 2011.81,-374.02 2074.8,-437.01 R35.1 ; v1(1614.17,-1031.5) C47.2 C46.1 ; TP2.1 1759.84,-7.87 1759.84,118.11 1771.65,129.92 C22.2
  Top Layer w15: C22.2 v1(1807.09,129.92) R3.2 C15.2 ; U2.1 1877.95,89.57 C15.2 ; C16.1 1933.07,161.42 v1(1889.76,161.42) 1877.95,149.61 C15.2
  Bottom Layer w10: v1(1614.17,-1031.5) 1614.17,-909.45 1744.09,-779.53 v1(1744.09,-374.02) ; v1(1889.76,161.42) 1901.57,173.23 v1(1901.57,220.47)
  Bottom Layer w20: v1(1744.09,-374.02) 1748.03,-370.08 1748.03,70.87 v1(1807.09,129.92)
-4V5: C19.2 C20.1 C23.2 C49.1 C51.2 R4.2 R29.1 R41.1 R42.1 TP3.1 U3.1 U11.3 | length 4855.3
  Top Layer w10: R29.1 846.46,822.83 830.71,807.09 688.98,807.09 665.35,783.46 665.35,484.25 814.96,334.65 1228.35,334.65 1362.2,200.79 1692.91,200.79 v1(1712.6,181.1) ; C49.1 C51.2 1359.65,-1031.5 U11.3 1406.89,-1028.94 1492.13,-1114.17 1763.78,-1114.17 1814.96,-1062.99 v1(1814.96,-842.52) ; R41.1 1370.08,-779.53 1393.7,-803.15 1775.59,-803.15 v1(1814.96,-842.52) ; v1(1712.6,-90.55) 1748.03,-125.98 C23.2 1759.84,-153.54 1759.84,-263.78 TP3.1 ; R42.1 2047.24,-842.52 v1(1814.96,-842.52)
  Top Layer w15: C23.2 R4.2 C19.2 ; U3.1 1877.95,-166.34 C19.2 ; C20.1 1956.69,-110.24 1940.94,-94.49 1893.7,-94.49 1877.95,-110.24 C19.2
  Bottom Layer w10: v1(1712.6,-90.55) v1(1712.6,181.1)
  Bottom Layer w20: v1(1807.09,-125.98) 1791.34,-141.73 1791.34,-338.58 1814.96,-362.2 v1(1814.96,-842.52)
-5V: C11.2 C12.1 C17.1 C18.2 TP4.1 U3.5 U3.8 U4.1 | length 1101.3
  Top Layer w15: U4.1 1590.27,88.3 1590.27,125.7 C11.2 1637.8,141.73 TP4.1 C12.1 1692.91,70.87 1724.41,39.37 1724.41,-43.31 1759.84,-78.74 v1(1842.52,-78.74) ; C17.1 1988.19,-314.96 2003.94,-330.71 2055.12,-330.71 2066.93,-318.9 C18.2 2066.93,-258.86 U3.5 ; U3.8 2101.38,-174.21 v1(2102.36,-173.23)
  Bottom Layer w15: v1(1842.52,-78.74) 1874.02,-110.24 2039.37,-110.24 v1(2102.36,-173.23) 2066.93,-208.66 v1(2066.93,-271.65)
GND: C1.1 C2.1 C3.2 C4.2 C5.1 C6.1 C7.1 C8.1 C9.2 C10.1 C11.1 C12.2 C13.2 C14.1 C15.1 C16.2 C17.2 C18.1 C19.1 C20.2 C24.1 C25.1 C26.1 C27.1 C28.2 C29.2 C30.1 C31.1 C32.2 C33.1 C34.2 C35.1 C36.2 C37.2 C38.2 C39.1 C40.1 C41.1 C42.1 C43.2 C44.2 C45.1 C46.2 C47.1 C49.2 C50.2 C51.1 C52.2 C53.1 C54.1 C55.2 C56.2 C57.2 C58.1 C59.1 P1.2 P3.2 P3.3 P3.4 P5.2 P5.3 P5.4 P6.2 R6.1 R7.1 R8.1 R9.1 R17.2 R19.1 R28.2 R30.2 R31.2 R36.1 R38.2 R40.2 TP5.1 TP6.1 TP7.1 TP8.1 TP11.1 TP15.1 TP16.1 TP18.1 TP20.1 TP22.1 U1.6 U1.7 U1.11 U1.12 U1.13 U1.14 U1.15 U2.4 U2.9 U3.4 U3.9 U4.2 U5.4 U5.8 U6.2 U7.2 U9.4 U9.8 U10.2 U11.2 U11.4 U11.7 | length 4478.5
  Top Layer w10: v1(582.68,-196.85) C25.1 ; v1(610.24,-299.21) C27.1 ; v1(637.8,3.94) C2.1@637.8,39.37 ; v1(637.8,606.3) C42.1 ; v1(736.22,484.25) C36.2 ; C43.2 v1(736.22,854.33) ; C45.1 v1(791.34,854.33) ; v1(814.96,-299.21) R9.1 ; v1(846.46,484.25) C39.1 ; v1(917.32,-299.21) R6.1 ; v1(976.38,535.43) C44.2 ; v1(976.38,590.55) R28.2 ; C34.2 v1(1011.81,870.08) ; v1(1047.24,90.55) C4.2 ; U10.2 v1(1157.48,535.43) ; U6.2 v1(1157.48,807.09) ; R38.2 v1(1204.72,-531.5) ; v1(1228.35,-940.94) C49.2 C51.1 ; v1(1259.84,-787.4) C56.2 ; C53.1 v1(1259.84,-401.57) ; v1(1283.46,-940.94) C51.1 ; v1(1314.96,-787.4) C58.1 ; C50.2 v1(1314.96,-401.57) ; C38.2 v1(1362.2,480.32) ; C41.1 v1(1362.2,590.55) ; C29.2 v1(1362.2,751.97) ; C31.1 v1(1362.2,862.2) ; v1(1362.2,-1114.37) U11.4 ; U11.2 1286.02,-978.94 C51.1 ; U11.2@1385.83,-976.38 v1(1421.26,-976.38) ; R36.1 v1(1425.2,-401.57) ; C9.2 v1(1440.94,98.43) ; C33.1 v1(1460.63,-267.72) C32.2 ; v1(1507.87,-976.38) C47.1 ; C10.1 v1(1547.24,141.73) C11.1 ; U4.2@1547.24,90.55 v1(1547.24,110.24) ; v1(1574.8,-267.72) U7.2 ; v1(1645.67,-940.94) C47.1 ; C12.2 v1(1681.1,15.75) ; R31.2 v1(1728.35,-1078.74) ; v1(1700.79,-940.94) C46.2 C47.1 ; R19.1 v1(1720.47,-271.65) C35.1 ; v1(1826.77,-279.53) R8.1 1833.66,-250.98 U3.4 1971.46,-250.98 ; v1(1826.77,-23.62) R7.1 1833.66,4.92 U2.4 1934.06,4.92 ; C19.1 1950.79,-159.45 v1(1950.79,-164.57) ; C15.1 1972.44,74.8 U2.9@1972.44,59.06 ; C17.2 1933.07,-278.35 v1(1950.79,-260.63) ; C13.2 1933.07,3.94 1934.06,4.92 ; v1(1964.57,-905.51) C57.2 ; C54.1 v1(1964.57,-519.68) ; v1(1984.25,448.82) v1(2031.5,448.82) 2133.86,448.82 C37.2 v1(2173.23,444.88) ; v1(1984.25,889.76) v1(2035.43,889.76) 2133.86,889.76 C28.2 v1(2173.23,885.83) ; v1(1994.09,-260.63) 2027.56,-294.09 C18.1 ; v1(1994.09,-164.57) 2011.81,-146.85 C20.2 ; C16.2 2011.81,98.43 U2.9@1972.44,59.06 ; v1(2019.69,-905.51) C59.1 ; C52.2 v1(2019.69,-519.68) ; C14.1 2027.56,-15.56 1972.44,39.56 U2.9 ; R30.2 v1(2118.11,653.54) ; R17.2 v1(2118.11,1094.49) ; v1(2118.11,-303.15) C26.1 ; v1(2118.11,-47.24) C24.1 ; C55.2 v1(2177.17,-740.16) R40.2 ; 1934.06,4.92 U2.9 ; U2.9 U2.9@1972.44,59.06
  Top Layer w30: P1.2 494.88,-50 C1.1 v1(500,-102.36) ; C3.2 637.8,-19.68 C2.1 ; U9.8 v1(1653.54,448.82) v1(1708.66,448.82) v1(1940.94,448.82) v1(1984.25,448.82) ; U5.8 v1(1653.54,889.76) v1(1708.66,889.76) v1(1937.01,889.76) v1(1984.25,889.76)
  other v1: 2401.57,-826.77 2480.31,-826.77 2559.06,-826.77 2637.8,-826.77 1059.06,-807.09 2362.2,-787.4 2440.94,-787.4 2519.69,-787.4 2598.43,-787.4 2677.17,-787.4 1059.06,-708.66 1909.45,-614.17 1059.06,-610.24 1885.83,-291.34 1224.41,-283.46 1318.9,-283.46 1271.65,-263.78 1224.41,-244.09 1318.9,-244.09 1950.79,-212.6 1994.09,-212.6 791.34,-200.79 846.46,-200.79 1007.87,-196.85 1047.24,-196.85 818.9,-173.23 1027.56,-149.61 791.34,-145.67 846.46,-145.67 1484.25,-114.17 1007.87,-102.36 1047.24,-102.36 791.34,-94.49 846.46,-94.49 818.9,-66.93 1007.87,-66.93 1047.24,-66.93 791.34,-39.37 846.46,-39.37 1653.54,-35.43 1885.83,-35.43 1027.56,-19.69 1950.79,-4.72 1994.09,-4.72 1007.87,27.56 1047.24,27.56 1950.79,43.31 1994.09,43.31 1224.41,74.8 1318.9,74.8 1950.79,91.34 1994.09,91.34 1271.65,94.49 1224.41,114.17 1318.9,114.17 1255.91,161.42 1543.31,393.7 1598.43,393.7 1653.54,393.7 1708.66,393.7 1570.87,421.26 1625.98,421.26 1681.1,421.26 1543.31,448.82 1598.43,448.82 1570.87,476.38 1625.98,476.38 1681.1,476.38 1543.31,503.94 1598.43,503.94 1653.54,503.94 1708.66,503.94 944.88,614.17 1543.31,834.65 1598.43,834.65 1653.54,834.65 1708.66,834.65 1570.87,862.2 1625.98,862.2 1681.1,862.2 1543.31,889.76 1598.43,889.76 1570.87,917.32 1625.98,917.32 1681.1,917.32 1543.31,944.88 1598.43,944.88 1653.54,944.88 1708.66,944.88
NetC21_1: C21.1 U4.6 | length 59.9
  Top Layer w10: U4.6 1584.65,-68.9 C21.1
NetC21_2: C21.2 U4.5 | length 59.1
  Top Layer w10: C21.2 U4.5
NetC22_1: C22.1 R3.1 R7.2 U2.2 | length 139.8
  Top Layer w10: C22.1 R3.1 R7.2 1831.69,56.1 U2.2
NetC23_1: C23.1 R4.1 R8.2 U3.2 | length 139.8
  Top Layer w10: C23.1 R4.1 R8.2 1831.69,-199.8 U3.2
NetC24_2: C24.2 U2.6 | length 60.3
  Top Layer w10: U2.6 2115.16,30.51 C24.2
NetC25_2: C25.2 U1.5 | length 89.1
  Top Layer w10: C25.2 624.02,-147.64 U1.5
NetC26_2: C26.2 U3.6 | length 60.3
  Top Layer w10: U3.6 2115.16,-225.39 C26.2
NetC27_2: C27.2 R5.1 | length 47.2
  Top Layer w10: C27.2 R5.1
NetC29_1: C29.1 C31.2 R12.2 U6.5 | length 146.5
  Top Layer w10: U6.5 1269.68,844.49 1271.65,842.52 R12.2 C29.1
NetC32_1: C32.1 C33.2 R15.2 U7.5 | length 272.6
  Top Layer w10: R15.2 C32.1 C33.2 1440.94,-338.58 1482.28,-338.58 U7.5
NetC34_1: C34.1 R16.1 U6.3 | length 114.3
  Top Layer w10: C34.1 R16.1 1076.77,769.69 U6.3
NetC35_2: C35.2 R18.1 R19.2 U7.3 | length 191.4
  Top Layer w10: U7.3 1659.45,-230.32 C35.2 ; R19.2 C35.2 ; R18.1 C35.2
NetC36_1: C36.1 C39.2 R23.2 U8.5 | length 172.7
  Top Layer w10: C36.1 R23.2 C39.2 846.46,612.2 U8.5
NetC38_1: C38.1 C41.2 R24.2 U10.5 | length 172.7
  Top Layer w10: U10.5 1253.94,572.83 C41.2 C38.1
NetC42_2: C42.2 R26.2 U8.3 | length 134.5
  Top Layer w10: C42.2 R26.2 738.19,708.66 U8.3
NetC43_1: C43.1 C45.2 R29.2 U8.2 | length 165.4
  Top Layer w10: C43.1 C45.2 ; U8.2 C45.2 ; R29.2 C45.2
NetC44_1: C44.1 R27.1 R28.1 U10.3 | length 172.7
  Top Layer w10: R28.1 C44.1 R27.1 1084.65,498.03 U10.3
NetC48_1: C48.1 R32.1 R36.2 U12.4 | length 310.3
  Top Layer w10: U12.4 1405.51,-547.24 C48.1 R36.2 1576.38,-492.13 R32.1
NetC50_1: C50.1 C53.2 R34.2 U12.5 | length 172.7
  Top Layer w10: U12.5 1277.56,-509.84 C53.2 C50.1 R34.2
NetC52_1: C52.1 C54.2 R35.2 U13.5 | length 172.7
  Top Layer w10: U13.5 1982.28,-627.95 C54.2 R35.2
NetC55_1: C55.1 R39.1 R40.1 U13.3 | length 178.5
  Top Layer w10: U13.3 2064.96,-767.72 C55.1 R40.1 R39.1
NetC56_1: C56.1 C58.2 R41.2 U12.2 | length 165.4
  Top Layer w10: C56.1 C58.2 ; U12.2 C58.2 ; R41.2 C58.2
NetC57_1: C57.1 C59.2 R42.2 U13.2 | length 165.4
  Top Layer w10: C57.1 C59.2 ; U13.2 C59.2 ; R42.2 C59.2
NetD1_1: D1.1 L1.2 U1.1 U1.2
NetR1_1: R1.1 R2.2 U1.9 | length 242.6
  Top Layer w10: U1.9 968.5,-173.23 980.32,-185.04 980.32,-212.6 992.13,-224.41 1035.43,-224.41 R2.2 R1.1
NetR2_1: R2.1 R6.2 | length 47.2
  Top Layer w10: R6.2 R2.1
NetR5_2: R5.2 U1.8 | length 216.5
  Top Layer w10: R5.2 767.72,-244.09 780.34,-231.47 922.07,-231.47 933.07,-220.47 U1.8
NetR9_2: R9.2 U1.10 | length 226.9
  Top Layer w10: v1(850.39,-263.78) R9.2 ; U1.10 v1(970.47,-147.64)
  Bottom Layer w10: v1(850.39,-263.78) 968.5,-145.67 v1(970.47,-147.64)
NetR10_2: R10.2 R14.1 U6.4 | length 226.2
  Top Layer w10: R14.1 1216.54,728.35 U6.4 1181.1,805.12 1181.1,881.89 1196.85,897.64 R10.2
NetR11_2: R11.2 U5.2 | length 99.1
  Top Layer w10: U5.2 2081.1,789.76 R11.2
NetR13_2: R13.2 U7.4 | length 69.2
  Top Layer w10: U7.4 1515.75,-188.98 R13.2
NetR17_1: R17.1 TP9.1 U5.7 | length 156.7
  Top Layer w10: U5.7 2133.46,1039.76 TP9.1
NetR20_2: R20.2 U8.4 | length 171.6
  Top Layer w10: U8.4 753.94,643.7 783.46,673.23 866.14,673.23 R20.2
NetR21_2: R21.2 R25.1 U10.4 | length 226.2
  Top Layer w10: R25.1 1196.85,478.35 U10.4 1181.1,533.46 1181.1,618.11 R21.2
NetR22_2: R22.2 U9.2 | length 99.1
  Top Layer w10: U9.2 2081.1,348.82 R22.2
NetR30_1: R30.1 TP12.1 U9.7 | length 156.7
  Top Layer w10: U9.7 1987.24,594.49 TP12.1
NetR33_2: R33.2 U13.4 | length 172.1
  Top Layer w10: R33.2 1929.13,-704.72 2017.72,-704.72 U13.4
NetR37_1: R37.1 U12.3 | length 95.7
  Top Layer w10: U12.3 1370.08,-641.73 R37.1
R12V: R13.1 R16.2 R27.2 TP17.1 U7.1 | length 1696
  Top Layer w10: v1(980.32,480.32) R27.2 1023.62,480.31 1039.37,496.06 1039.37,751.97 R16.2 ; v1(1011.81,409.45) 1031.5,389.76 1267.72,389.76 v1(1362.2,295.28) ; v1(1362.2,141.73) 1362.2,11.81 1444.88,-70.87 1492.13,-70.87 R13.1 ; U7.1 1580.71,-305.12 1554.94,-279.35 1554.94,-259.49 1555.12,-259.32 1555.12,-204.72 R13.1 ; TP17.1 1641.73,-118.11 R13.1
  Bottom Layer w10: v1(980.32,480.32) 980.32,440.94 v1(1011.81,409.45) ; v1(1362.2,141.73) v1(1362.2,295.28)
RX_AMP: C48.2 P4.3 R32.2 R38.1 TP13.1 U11.8 U12.1 | length 1202
  Top Layer w10: P4.3 833.07,-608.66 TP13.1 866.14,-641.73 1137.8,-641.73 1157.48,-622.05 R38.1 1257.87,-622.05 U12.1 1277.56,-612.2 1295.28,-594.49 1397.64,-594.49 C48.2 1506.3,-622.05 R32.2 ; U11.8 1578.74,-917.13 v1(1578.74,-901.57)
  Bottom Layer w10: v1(1578.74,-901.57) R32.2
RX_BUFF: R33.1 R37.2 TP14.1 U13.1 | length 641
  Top Layer w10: R37.2 1437.01,-740.16 R33.1 ; TP14.1 R33.1 ; U13.1 1929.13,-759.84 R33.1
RX_IN: P6.1 R39.2 | length 362.1
  Top Layer w10: R39.2 2224.41,-610.24 P6.1
  other v1: 2362.2,-629.92 2440.94,-629.92 2519.69,-629.92 2598.43,-629.92 2677.17,-629.92 2401.57,-590.55 2480.31,-590.55 2559.06,-590.55 2637.8,-590.55
RX_MIX: P4.1 R31.1 TP21.1 U11.5 | length 1089
  Top Layer w10: P4.1 725.98,-807.09 TP21.1 881.89,-854.33 1389.76,-854.33 1456.69,-921.26 1456.69,-1027.56 1508.07,-1078.94 U11.5 1637.6,-1078.94 R31.1
RX_OUT: P4.2 P5.1 TP19.1 | length 329.5
  Top Layer w10: P5.1 P4.2 TP19.1
TX_AMP_N: R14.2 R21.1 U9.1 U10.1 | length 1232.7
  Top Layer w10: v1@1141.73,594.49 R21.1 R14.2 ; U9.1 2058.66,298.82 v1(2059.06,299.21)
  Bottom Layer w10: v1(1137.8,594.49) 1433.07,299.21 v1(2059.06,299.21)
TX_AMP_P: R10.1 U5.1 U6.1 | length 1139.9
  Top Layer w10: U6.1 v1(1122.05,881.89) 1122.05,885.83 R10.1 ; U5.1 2058.66,739.76 v1(2059.06,740.16)
  Bottom Layer w10: v1(1122.05,881.89) 1220.47,783.46 1401.57,783.46 1444.88,740.16 v1(2059.06,740.16)
TX_BUFF: R20.1 R25.2 TP10.1 U8.1 U11.1 | length 3191.7
  Top Layer w10: U8.1 848.43,704.72 R20.1 R20.1@901.57,704.72 ; TP10.1 917.32,704.72 R20.1@901.57,704.72 ; v1(972.44,-909.45) 1287.4,-909.45 1306.89,-928.94 U11.1 ; R25.2 984.25,437.01 v1(913.39,507.87) 913.39,622.05 929.13,637.8 929.13,677.17 R20.1@901.57,704.72
  Bottom Layer w10: v1(913.39,507.87) 807.09,401.57 543.31,401.57 433.07,291.34 433.07,-381.89 511.81,-460.63 838.58,-460.63 944.88,-566.93 944.88,-881.89 v1(972.44,-909.45)
TX_IN: P3.1 R26.1 | length 132.7
  Top Layer w10: P3.1 R26.1
TX_OUT_N: P2.2 R22.1 U9.6 | length 753.8
  Top Layer w10: R22.1 v1(2129.92,405.51)
  Top Layer w40: U9.6 2265.35,548.82 2326.77,610.24 P2.2
  Bottom Layer w10: v1(2129.92,405.51) v1(2129.92,551.18)
  other v1: 2401.57,590.55 2480.31,590.55 2559.06,590.55 2637.8,590.55 2362.2,629.92 2440.94,629.92 2519.69,629.92 2598.43,629.92 2677.17,629.92
TX_OUT_P: P2.1 R11.1 U5.6 | length 796.1
  Top Layer w10: R11.1 v1(2125.98,846.46)
  Top Layer w40: U5.6 2179.53,989.76 2362.2,807.09 P2.1
  Bottom Layer w10: v1(2125.98,846.46) v1(2125.98,988.19)
  other v1: 2362.2,787.4 2440.94,787.4 2519.69,787.4 2598.43,787.4 2677.17,787.4 2401.57,826.77 2480.31,826.77 2559.06,826.77 2637.8,826.77
pads on no net: D1.3 R32.3 U2.3 U2.7 U3.3 U3.7 U5.3 U9.3

## Polygon pours and split planes (outlines as drawn)
GND on Bottom Layer "GND_BOT" (solid, remove dead copper, pour order 0): 0,1181.1 0,-1181.1 2755.91,-1181.1 2755.91,1181.1 0,1181.1
no net on Internal Plane 2 (split plane): 2608.23,1160.74 2617.99,1159.69 2627.65,1157.95 2637.15,1155.52 2646.47,1152.42 2655.53,1148.67 2664.31,1144.27 2672.75,1139.27 2680.81,1133.67 2688.45,1127.51 2695.63,1120.83 2702.32,1113.64 2708.47,1106 2714.07,1097.94 2719.08,1089.5 2723.47,1080.73 2727.23,1071.66 2730.32,1062.35 2732.75,1052.84 2734.49,1043.19 2735.54,1033.43 2735.87,1024.25 2735.81,1023.62 2735.81,-1023.62 2735.87,-1024.25 2735.54,-1033.43 2734.49,-1043.19 2732.75,-1052.84 2730.32,-1062.35 2727.23,-1071.66 2723.47,-1080.73 2719.08,-1089.5 2714.07,-1097.94 2708.47,-1106 2702.32,-1113.64 2695.63,-1120.83 2688.45,-1127.51 2680.81,-1133.67 2672.75,-1139.27 2664.31,-1144.27 2655.53,-1148.67 2646.47,-1152.42 2637.15,-1155.52 2627.65,-1157.95 2617.99,-1159.69 2608.23,-1160.74 2599.05,-1161.07 2598.43,-1161.01 157.48,-1161.01 156.85,-1161.07 147.67,-1160.74 137.92,-1159.69 128.26,-1157.95 118.75,-1155.52 109.44,-1152.42 100.37,-1148.67 91.6,-1144.27 83.16,-1139.27 75.1,-1133.67 67.46,-1127.51 60.28,-1120.83 53.59,-1113.64 47.43,-1106 41.83,-1097.94 36.83,-1089.5 32.43,-1080.73 28.68,-1071.66 25.58,-1062.35 23.15,-1052.84 21.41,-1043.19 20.36,-1033.43 20.03,-1024.25 20.1,-1023.62 20.1,1023.62 20.03,1024.25 20.36,1033.43 21.41,1043.19 23.15,1052.84 25.58,1062.35 28.68,1071.66 32.43,1080.73 36.83,1089.5 41.83,1097.94 47.43,1106 53.59,1113.64 60.28,1120.83 67.46,1127.51 75.1,1133.67 83.16,1139.27 91.6,1144.27 100.37,1148.67 109.44,1152.42 118.75,1155.52 128.26,1157.95 137.92,1159.69 147.67,1160.74 156.85,1161.07 157.48,1161.01 2598.43,1161.01 2599.05,1161.07
GND on Internal Plane 3 (split plane): 2608.23,1160.74 2617.99,1159.69 2627.65,1157.95 2637.15,1155.52 2646.47,1152.42 2655.53,1148.67 2664.31,1144.27 2672.75,1139.27 2680.81,1133.67 2688.45,1127.51 2695.63,1120.83 2702.32,1113.64 2708.47,1106 2714.07,1097.94 2719.08,1089.5 2723.47,1080.73 2727.23,1071.66 2730.32,1062.35 2732.75,1052.84 2734.49,1043.19 2735.54,1033.43 2735.87,1024.25 2735.81,1023.62 2735.81,-1023.62 2735.87,-1024.25 2735.54,-1033.43 2734.49,-1043.19 2732.75,-1052.84 2730.32,-1062.35 2727.23,-1071.66 2723.47,-1080.73 2719.08,-1089.5 2714.07,-1097.94 2708.47,-1106 2702.32,-1113.64 2695.63,-1120.83 2688.45,-1127.51 2680.81,-1133.67 2672.75,-1139.27 2664.31,-1144.27 2655.53,-1148.67 2646.47,-1152.42 2637.15,-1155.52 2627.65,-1157.95 2617.99,-1159.69 2608.23,-1160.74 2599.05,-1161.07 2598.43,-1161.01 157.48,-1161.01 156.85,-1161.07 147.67,-1160.74 137.92,-1159.69 128.26,-1157.95 118.75,-1155.52 109.44,-1152.42 100.37,-1148.67 91.6,-1144.27 83.16,-1139.27 75.1,-1133.67 67.46,-1127.51 60.28,-1120.83 53.59,-1113.64 47.43,-1106 41.83,-1097.94 36.83,-1089.5 32.43,-1080.73 28.68,-1071.66 25.58,-1062.35 23.15,-1052.84 21.41,-1043.19 20.36,-1033.43 20.03,-1024.25 20.1,-1023.62 20.1,1023.62 20.03,1024.25 20.36,1033.43 21.41,1043.19 23.15,1052.84 25.58,1062.35 28.68,1071.66 32.43,1080.73 36.83,1089.5 41.83,1097.94 47.43,1106 53.59,1113.64 60.28,1120.83 67.46,1127.51 75.1,1133.67 83.16,1139.27 91.6,1144.27 100.37,1148.67 109.44,1152.42 118.75,1155.52 128.26,1157.95 137.92,1159.69 147.67,1160.74 156.85,1161.07 157.48,1161.01 2598.43,1161.01 2599.05,1161.07
GND on Internal Plane 4 (split plane): 2735.81,-1023.62 2735.87,-1024.25 2735.54,-1033.43 2734.49,-1043.19 2732.75,-1052.84 2730.32,-1062.35 2727.23,-1071.66 2723.47,-1080.73 2719.08,-1089.5 2714.07,-1097.94 2708.47,-1106 2702.32,-1113.64 2695.63,-1120.83 2688.45,-1127.51 2680.81,-1133.67 2672.75,-1139.27 2664.31,-1144.27 2655.53,-1148.67 2646.47,-1152.42 2637.15,-1155.52 2627.65,-1157.95 2617.99,-1159.69 2608.23,-1160.74 2599.05,-1161.07 2598.43,-1161.01 157.48,-1161.01 156.85,-1161.07 147.67,-1160.74 137.92,-1159.69 128.26,-1157.95 118.75,-1155.52 109.44,-1152.42 100.37,-1148.67 91.6,-1144.27 83.16,-1139.27 75.1,-1133.67 67.46,-1127.51 60.28,-1120.83 53.59,-1113.64 47.43,-1106 41.83,-1097.94 36.83,-1089.5 32.43,-1080.73 28.68,-1071.66 25.58,-1062.35 23.15,-1052.84 21.41,-1043.19 20.36,-1033.43 20.03,-1024.25 20.1,-1023.62 20.1,-364.42 1771.65,-364.42 1774.26,-364.07 1776.7,-363.07 1778.79,-361.46 1780.39,-359.37 1781.4,-356.94 1781.74,-354.33 1781.74,186.76 2735.81,186.76
24V on Internal Plane 4 (split plane): 2608.23,1160.74 2617.99,1159.69 2627.65,1157.95 2637.15,1155.52 2646.47,1152.42 2655.53,1148.67 2664.31,1144.27 2672.75,1139.27 2680.81,1133.67 2688.45,1127.51 2695.63,1120.83 2702.32,1113.64 2708.47,1106 2714.07,1097.94 2719.08,1089.5 2723.47,1080.73 2727.23,1071.66 2730.32,1062.35 2732.75,1052.84 2734.49,1043.19 2735.54,1033.43 2735.87,1024.25 2735.81,1023.62 2735.81,206.94 1771.65,206.94 1769.04,206.59 1766.61,205.59 1764.52,203.98 1762.92,201.89 1761.91,199.46 1761.57,196.85 1761.57,-344.24 20.1,-344.24 20.1,1023.62 20.03,1024.25 20.36,1033.43 21.41,1043.19 23.15,1052.84 25.58,1062.35 28.68,1071.66 32.43,1080.73 36.83,1089.5 41.83,1097.94 47.43,1106 53.59,1113.64 60.28,1120.83 67.46,1127.51 75.1,1133.67 83.16,1139.27 91.6,1144.27 100.37,1148.67 109.44,1152.42 118.75,1155.52 128.26,1157.95 137.92,1159.69 147.67,1160.74 156.85,1161.07 157.48,1161.01 2598.43,1161.01 2599.05,1161.07

## Keep-outs
Keep-Out Layer:
  the board outline again, w5

## Other copper
Top Layer:
  rectangle net 24V: 1125.98,-212.6 1334.65,43.31
  region net GND: 598.43,-165.35 598.43,-283.46 637.8,-283.46 637.8,-224.41 641.73,-220.47 885.83,-220.47 885.83,-129.92 1000,-129.92 1000,-204.72 1102.36,-204.72 1102.36,110.24 1035.43,110.24 1035.43,39.37 1000,39.37 1000,-23.62 751.97,-23.62 748.03,-27.56 748.03,-165.35
  region net NetD1_1: 673.23,-78.74 673.23,-7.87 696.85,15.75 696.85,51.18 807.09,51.18 807.09,279.53 1066.93,279.53 1066.93,185.04 1019.68,185.04 1019.68,55.12 984.25,55.12 984.25,-3.94 736.22,-3.94 736.22,-78.74
Bottom Layer:
  rectangle net GND: 2322.83,-846.46 2716.54,-767.72
  rectangle net RX_IN: 2326.77,-649.61 2716.54,-570.87
  rectangle net TX_OUT_N: 2322.83,570.87 2716.54,649.61
  rectangle net TX_OUT_P: 2322.83,767.72 2716.54,846.46
Internal Plane 4 (plane layer: these items are gaps in the copper):
  lines w20: 0,-354.33 1771.65,-354.33 1771.65,196.85 2755.91,196.85

## Silkscreen, mask and mechanical layers (free items; w line width, h text height)
Top Overlay:
  rectangle: 11.81,291.34 129.92,330.71
  rectangle: 405.51,291.34 523.62,330.71
  region: 169.29,-299.21 51.18,-299.21 51.18,-338.58 169.29,-338.58
  region: 562.99,-299.21 444.88,-299.21 444.88,-338.58 562.99,-338.58
  region: 110.24,370.08 110.24,251.97 169.29,311.02
  region: 503.94,370.08 503.94,251.97 562.99,311.02
  region: 70.87,-377.95 70.87,-259.84 11.81,-318.9
  region: 464.57,-377.95 464.57,-259.84 405.51,-318.9
  text "F" at 2165.35,1019.68 h30
  text "TX_B" at 881.89,771.65 h30
  text "T" at 2311.02,685.04 h47.24
  text "F" at 2165.35,578.74 h30
  text "TX" at 200.79,248.03 h118.11
  text "24V" at 1220.47,192.91 h30
  text "5V IN" at 51.18,82.68 h47.24 r270
  text "+" at 169.29,70.87 h59.06 r180
  text "-5V" at 1720.47,0 h30 r90
  text "-" at 118.11,-27.56 h59.06 r270
  text "+4V5" at 1775.59,-90.55 h30
  text "R12V" at 1515.75,-129.92 h30
  text "-4V5" at 1775.59,-346.46 h30
  text "RX" at 204.72,-374.02 h118.11
  text "Designed by W.D." at 732.28,-425.2 h30
  text "2025.2" at 830.71,-480.31 h30
  text "RX_AMP" at 870.08,-625.98 h30
  text "RX_OUT" at 870.08,-724.41 h30
  text "R" at 2311.02,-736.22 h47.24
  text "RX_B" at 1866.14,-763.78 h30 r90
  text "RX_MIX" at 877.95,-822.83 h30
  text "RX Gain Adj" at 1448.82,-842.52 h30
  text "PS-25-001-E-02-A0" at 1870.08,-1035.43 h30
  text "MEGAPHASE" at 1984.25,-1090.55 h30
Mechanical 1:
  the board outline again, w5